# Altium PCB BatterySentinel-N2K-Orion-R5.PcbDoc
Units mil, origin at the board's own origin, x right, y up, seen from the top; angles counter-clockwise.
Board outline 2047.24 x 1417.32 mil, 2 copper layers (Top Layer, Bottom Layer), stack 62.992 mil thick; 37 components, 23 nets, 120 pads, 25 vias.
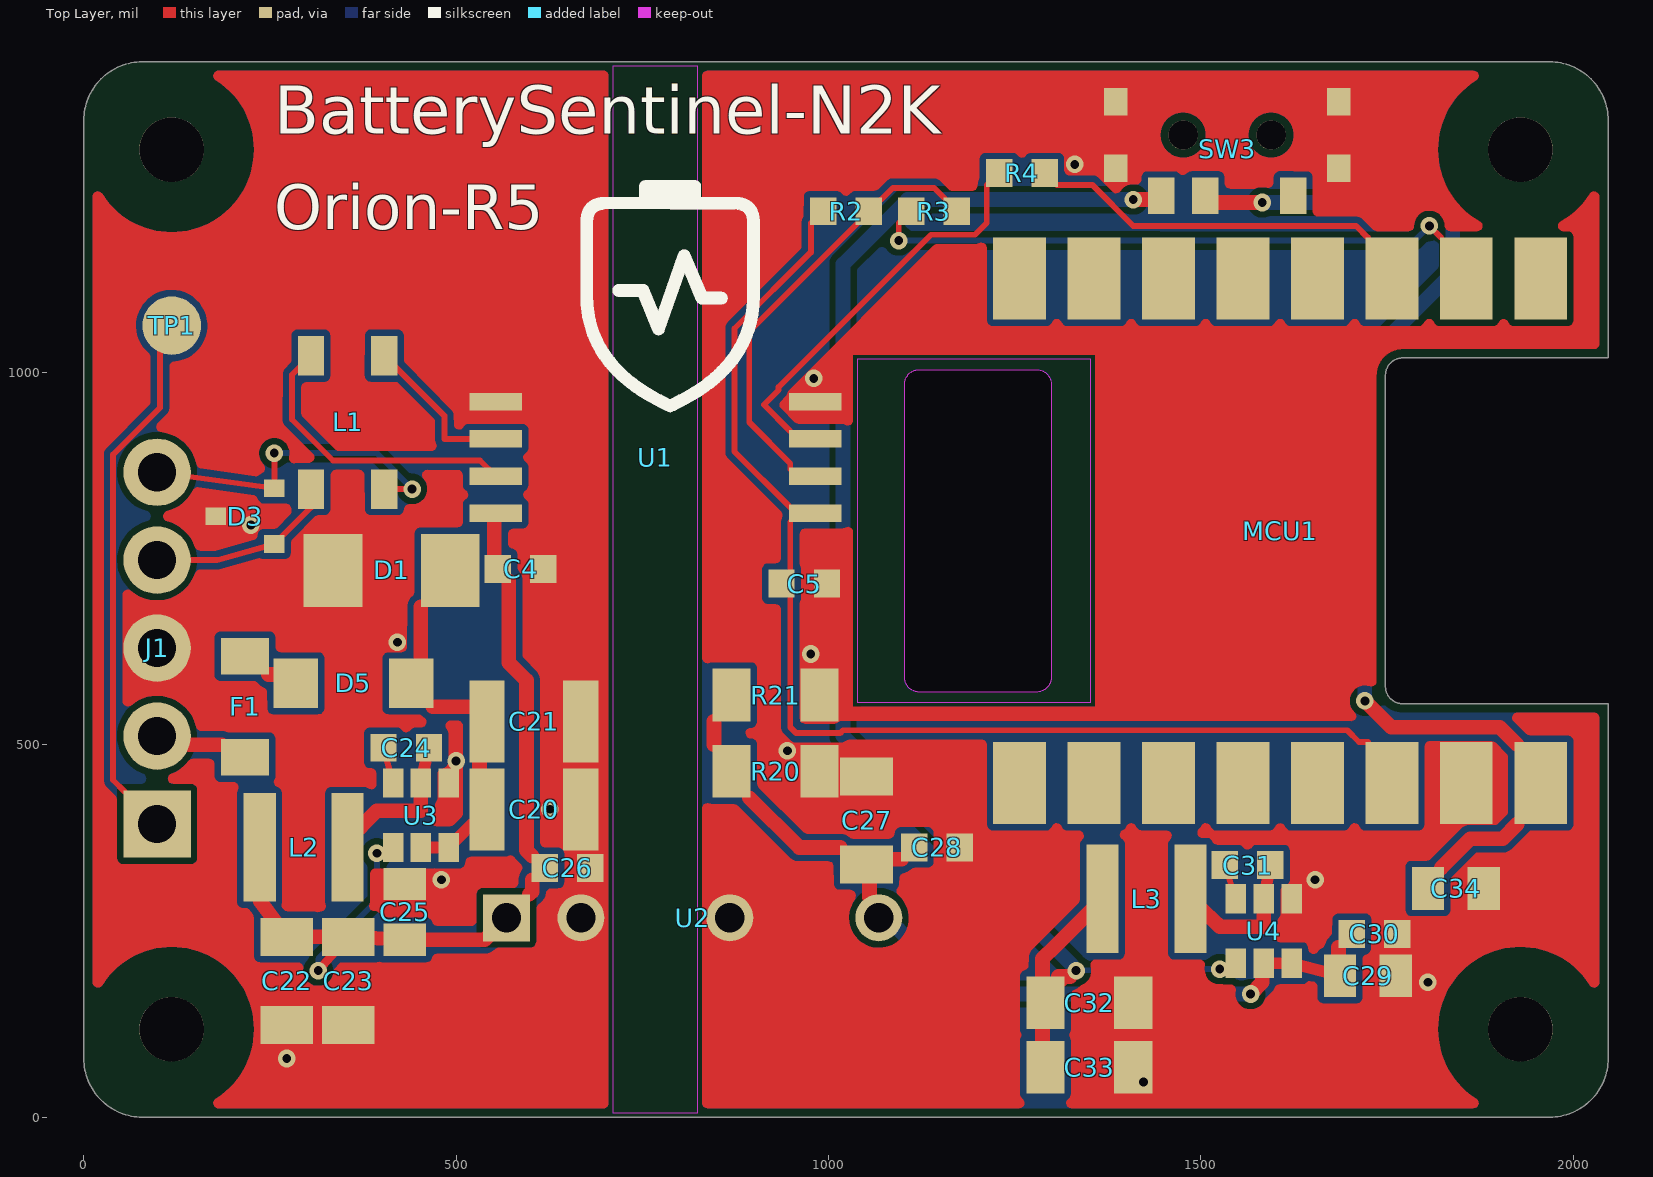
[diagram p0: Top Layer view]
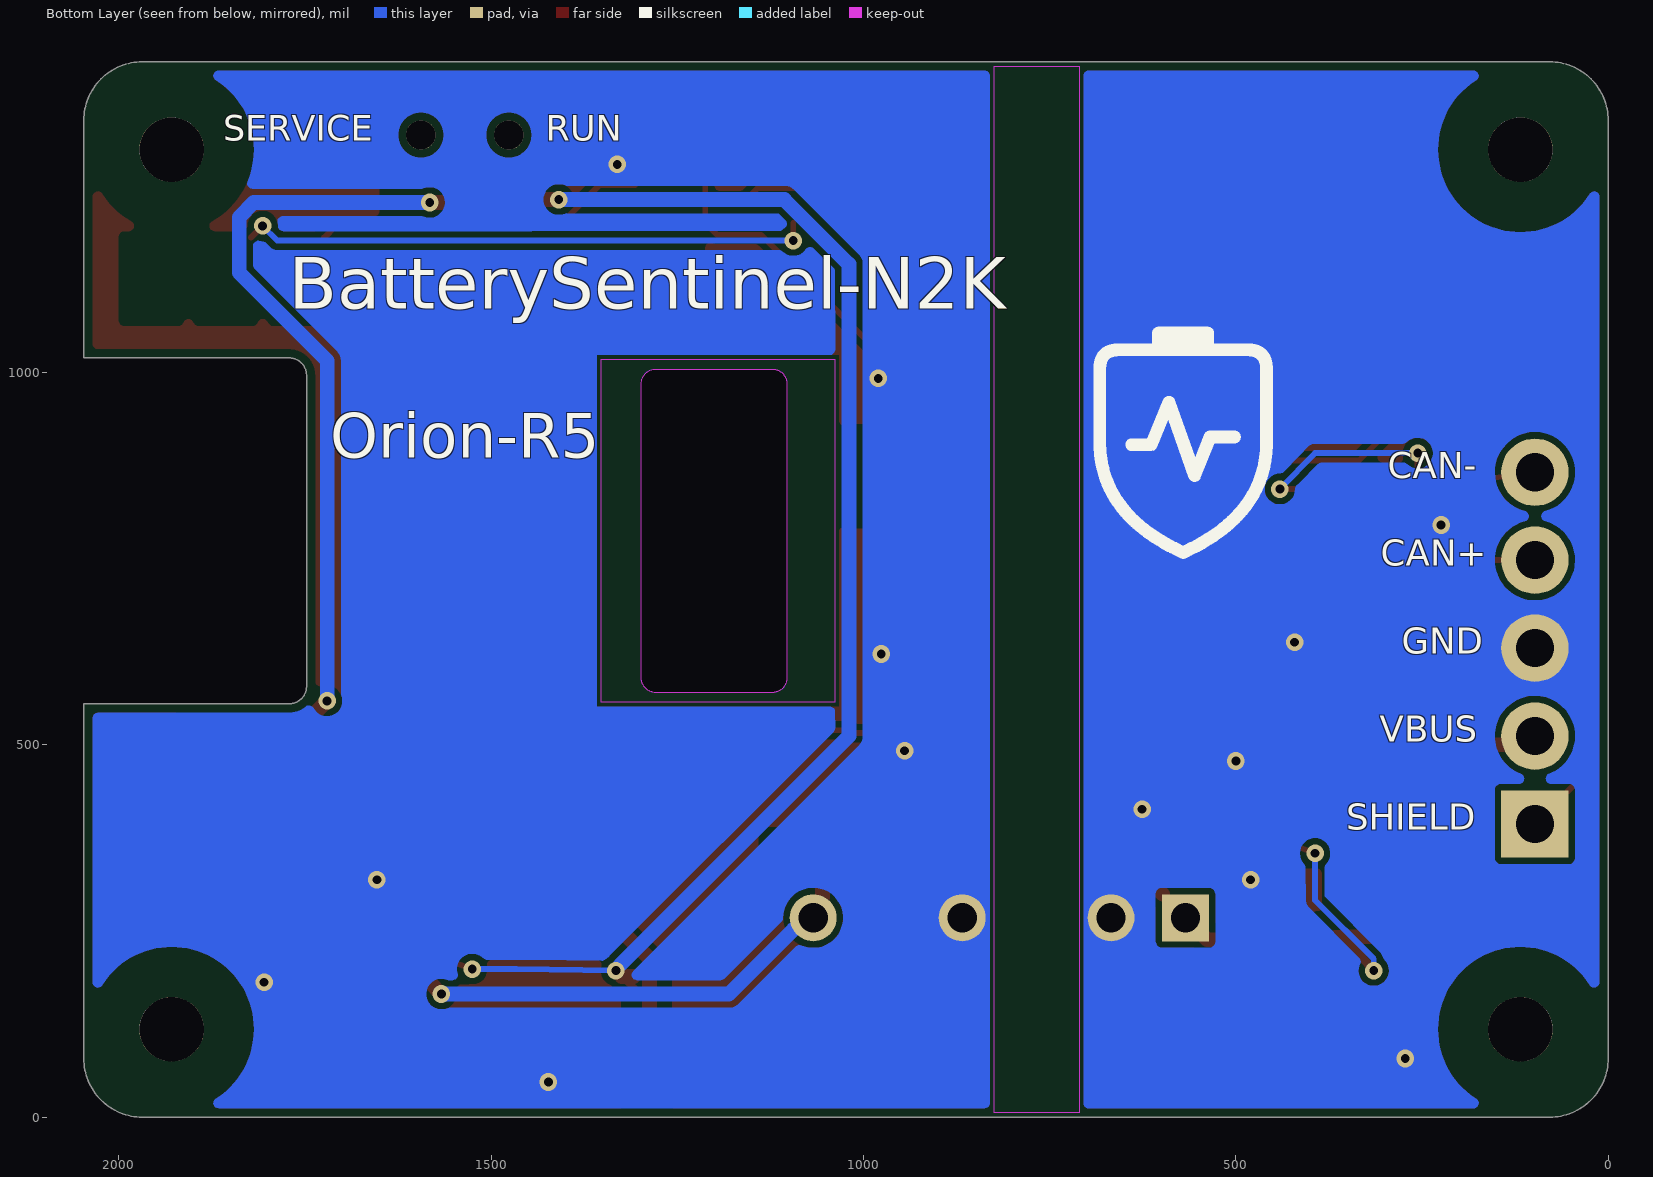
[diagram p1: Bottom Layer view, seen from below]

## Layer stack, top to bottom
Top Solder: solder mask 0.9843, SM-004, Dk 4
Top Layer: signal copper 1.378
Dielectric1: dielectric 60.2362, FR-4, Dk 4.3
Bottom Layer: signal copper 1.378
Bottom Solder: solder mask 0.9843, SM-004, Dk 4

## Board outline
78.74,0 74.88,0.09 71.02,0.38 67.19,0.85 63.38,1.51 59.61,2.36 55.88,3.39 52.21,4.6 48.61,5.99 45.07,7.56 41.62,9.3 38.26,11.2 34.99,13.27 31.83,15.5 28.79,17.87 25.86,20.4 23.06,23.06 20.4,25.86 17.87,28.79 15.5,31.83 13.27,34.99 11.2,38.26 9.3,41.62 7.56,45.07 5.99,48.61 4.6,52.21 3.39,55.88 2.36,59.61 1.51,63.38 0.85,67.19 0.38,71.02 0.09,74.88 0,78.74 0,1338.58 0.09,1342.45 0.38,1346.3 0.85,1350.14 1.51,1353.94 2.36,1357.71 3.39,1361.44 4.6,1365.11 5.99,1368.72 7.56,1372.25 9.3,1375.7 11.2,1379.06 13.27,1382.33 15.5,1385.49 17.87,1388.53 20.4,1391.46 23.06,1394.26 25.86,1396.93 28.79,1399.45 31.83,1401.83 34.99,1404.05 38.26,1406.12 41.62,1408.03 45.07,1409.76 48.61,1411.33 52.21,1412.72 55.88,1413.93 59.61,1414.96 63.38,1415.81 67.19,1416.47 71.02,1416.94 74.88,1417.23 78.74,1417.32 1968.5,1417.32 1972.37,1417.23 1976.22,1416.94 1980.06,1416.47 1983.87,1415.81 1987.64,1414.96 1991.36,1413.93 1995.03,1412.72 1998.64,1411.33 2002.17,1409.76 2005.62,1408.03 2008.98,1406.12 2012.25,1404.05 2015.41,1401.83 2018.46,1399.45 2021.38,1396.93 2024.18,1394.26 2026.85,1391.46 2029.37,1388.53 2031.75,1385.49 2033.97,1382.33 2036.04,1379.06 2037.95,1375.7 2039.68,1372.25 2041.25,1368.72 2042.64,1365.11 2043.85,1361.44 2044.88,1357.71 2045.73,1353.94 2046.39,1350.14 2046.86,1346.3 2047.15,1342.45 2047.24,1338.58 2047.24,1019.68 1771.65,1019.68 1770.49,1019.66 1769.34,1019.57 1768.19,1019.43 1767.05,1019.23 1765.91,1018.98 1764.8,1018.67 1763.7,1018.3 1762.61,1017.89 1761.55,1017.42 1760.52,1016.9 1759.51,1016.32 1758.53,1015.7 1757.58,1015.04 1756.67,1014.32 1755.79,1013.57 1754.95,1012.77 1754.15,1011.93 1753.39,1011.05 1752.68,1010.13 1752.01,1009.19 1751.39,1008.21 1750.82,1007.2 1750.3,1006.16 1749.83,1005.1 1749.41,1004.02 1749.05,1002.92 1748.74,1001.8 1748.49,1000.67 1748.29,999.53 1748.15,998.38 1748.06,997.22 1748.03,996.06 1748.03,578.74 1748.06,577.58 1748.15,576.42 1748.29,575.27 1748.49,574.13 1748.74,573 1749.05,571.88 1749.41,570.78 1749.83,569.7 1750.3,568.64 1750.82,567.6 1751.39,566.6 1752.01,565.62 1752.68,564.67 1753.39,563.75 1754.15,562.88 1754.95,562.04 1755.79,561.24 1756.67,560.48 1757.58,559.77 1758.53,559.1 1759.51,558.48 1760.52,557.91 1761.55,557.39 1762.61,556.92 1763.7,556.5 1764.8,556.14 1765.91,555.83 1767.05,555.57 1768.19,555.37 1769.34,555.23 1770.49,555.15 1771.65,555.12 2047.24,555.12 2047.24,78.74 2047.15,74.88 2046.86,71.02 2046.39,67.19 2045.73,63.38 2044.88,59.61 2043.85,55.88 2042.64,52.21 2041.25,48.61 2039.68,45.07 2037.95,41.62 2036.04,38.26 2033.97,34.99 2031.75,31.83 2029.37,28.79 2026.85,25.86 2024.18,23.06 2021.38,20.4 2018.46,17.87 2015.41,15.5 2012.25,13.27 2008.98,11.2 2005.62,9.3 2002.17,7.56 1998.64,5.99 1995.03,4.6 1991.36,3.39 1987.64,2.36 1983.87,1.51 1980.06,0.85 1976.22,0.38 1972.37,0.09 1968.5,0
cut-out: 1279.53,570.87 1122.05,570.87 1121.08,570.89 1120.12,570.96 1119.16,571.08 1118.21,571.24 1117.26,571.46 1116.33,571.71 1115.42,572.02 1114.51,572.36 1113.63,572.76 1112.77,573.19 1111.93,573.67 1111.11,574.18 1110.32,574.74 1109.56,575.33 1108.83,575.97 1108.13,576.63 1107.46,577.33 1106.83,578.06 1106.24,578.82 1105.68,579.61 1105.16,580.43 1104.69,581.27 1104.25,582.13 1103.86,583.02 1103.51,583.92 1103.21,584.84 1102.95,585.77 1102.74,586.71 1102.58,587.66 1102.46,588.62 1102.39,589.59 1102.36,590.55 1102.36,984.25 1102.39,985.22 1102.46,986.18 1102.58,987.14 1102.74,988.09 1102.95,989.03 1103.21,989.97 1103.51,990.88 1103.86,991.79 1104.25,992.67 1104.69,993.53 1105.16,994.37 1105.68,995.19 1106.24,995.98 1106.83,996.74 1107.46,997.47 1108.13,998.17 1108.83,998.84 1109.56,999.47 1110.32,1000.06 1111.11,1000.62 1111.93,1001.14 1112.77,1001.61 1113.63,1002.05 1114.51,1002.44 1115.42,1002.79 1116.33,1003.09 1117.26,1003.35 1118.21,1003.56 1119.16,1003.72 1120.12,1003.84 1121.08,1003.91 1122.05,1003.94 1279.53,1003.94 1280.49,1003.91 1281.46,1003.84 1282.42,1003.72 1283.37,1003.56 1284.31,1003.35 1285.24,1003.09 1286.16,1002.79 1287.06,1002.44 1287.94,1002.05 1288.81,1001.61 1289.65,1001.14 1290.46,1000.62 1291.25,1000.06 1292.02,999.47 1292.75,998.84 1293.45,998.17 1294.11,997.47 1294.74,996.74 1295.34,995.98 1295.9,995.19 1296.41,994.37 1296.89,993.53 1297.32,992.67 1297.71,991.79 1298.06,990.88 1298.37,989.97 1298.62,989.03 1298.83,988.09 1299,987.14 1299.12,986.18 1299.19,985.22 1299.21,984.25 1299.21,590.55 1299.19,589.59 1299.12,588.62 1299,587.66 1298.83,586.71 1298.62,585.77 1298.37,584.84 1298.06,583.92 1297.71,583.02 1297.32,582.13 1296.89,581.27 1296.41,580.43 1295.9,579.61 1295.34,578.82 1294.74,578.06 1294.11,577.33 1293.45,576.63 1292.75,575.97 1292.02,575.33 1291.25,574.74 1290.46,574.18 1289.65,573.67 1288.81,573.19 1287.94,572.76 1287.06,572.36 1286.16,572.02 1285.24,571.71 1284.31,571.46 1283.37,571.24 1282.42,571.08 1281.46,570.96 1280.49,570.89

## Design rules (kind name [scope] priority, off if disabled: settings)
BoardOutlineClearance BoardEdge_0_30mm [All] p1: gap=11.81 ignorepadtopadclearanceinfootprint=FALSE
Clearance Isolation_BUS_LOGIC [InNet('5V_BUS') Or InNet('BST_BUS') Or InNet('BUS_PROT') Or InNet('CANH') Or InNet('CANH_EXT') Or InNet('CANL') Or InNet('CANL_EXT') Or InNet('FUSED_IN') Or InNet('GND_BUS') Or InNet('NET_S') Or InNet('SHIELD') Or InNet('SW_BUS') vs InNet('3V3_LOGIC') Or InNet('5V_ISO') Or InNet('5V_MODULE') Or InNet('5V_REG') Or InNet('BST_LOGIC') Or InNet('GND_LOGIC') Or InNet('GPIO6') Or InNet('GPIO7') Or InNet('RXD') Or InNet('SW_LOGIC') Or InNet('TXD')] p1: gap=125.98 ignorepadtopadclearanceinfootprint=FALSE
Clearance Mounting_NPTH [IsPad And (HoleSize > 0) And (PadIsPlated = 'False') And (Not InComponent('SW3'))] p2: gap=66.93 ignorepadtopadclearanceinfootprint=FALSE
Clearance Switch_Locating_Holes [IsPad And (HoleSize > 0) And (PadIsPlated = 'False') And InComponent('SW3')] p3: gap=9.84 ignorepadtopadclearanceinfootprint=FALSE
Clearance [All] p4: gap=5.91 ignorepadtopadclearanceinfootprint=FALSE
ComponentClearance [All] p1: gap=9.84 collisioncheckmode=3 verticalgap=9.84 showdistances=FALSE
HoleSize [All] p1: absolutevalues=TRUE maxlimit=248.03 minlimit=11.81 maxpercent=80.000 minpercent=20.000
HoleToHoleClearance [All] p1: gap=9.84 allowstackedmicrovias=FALSE
MinimumAnnularRing PTH_AnnularRing [IsPad And (PadIsPlated = 'True')] p1: minimumring=7.09
MinimumAnnularRing Via_AnnularRing [IsVia] p2: minimumring=5.91
MinimumSolderMaskSliver [All] p1: minsoldermaskwidth=3.94
PasteMaskExpansion Paste_1to1 [All] p1: expansion=0
PolygonConnect [All] p1: connectstyle=Relief reliefconductorwidth=10 reliefentries=4 polygonreliefangle="90 Angle" airgapwidth=10
RoutingVias [All] p1: holewidth=11.81 width=23.62 viastyle="Through Hole" minholewidth=11.81 minwidth=23.62 maxholewidth=11.81 maxwidth=23.62
SilkToSilkClearance SilkToSilk [All] p1: silktosilkclearance=3.94
SilkToSolderMaskClearance R5_Legend_Clearance [IsPad] p1: minsilkscreentomaskgap=5.91 clearancetoexposedcopper=FALSE
SolderMaskExpansion TentedVias [IsVia] p1: expansion=-11.81 istentingtop=TRUE
SolderMaskExpansion PadSolderMask [All] p2: expansion=1.97 istentingtop=FALSE
Width [All] p1: maxlimit=78.74 minlimit=7.87 preferedwidth=11.81
23 further rules are at their usual default settings.

## Components (designator, comment, footprint, x,y, rotation, side; value= is the part's Value field where it differs from the comment)
C4 "100nF 50V X7R" C0603#1 586.61,736.22 r0 top
C5 "100nF 50V X7R" C0603#2 967.52,716.54 r0 top
C20 "10uF 50V X7R" C1210#1 604.33,413.39 r0 top
C21 "10uF 50V X7R" C1210#2 604.33,531.5 r0 top
C22 "22uF 25V X5R" C1206 272.64,183.07 r270 top
C23 "22uF 25V X5R" C1206 355.31,183.07 r270 top
C24 "100nF 50V X7R" C0603#2 433.07,496.06 r0 top
C25 "10uF 25V X5R" C0805 431.1,275.59 r90 top
C26 "100nF 50V X7R" C0603#3 649.61,334.65 r0 top
C27 "22uF 25V X5R" C1206 1051.18,398.62 r90 top
C28 "100nF 50V X7R" C0603#4 1145.67,362.2 r0 top
C29 "10uF 25V X5R" C0805 1724.41,189.96 r0 top
C30 "100nF 50V X7R" C0603#2 1733.27,246.06 r0 top
C31 "100nF 50V X7R" C0603#5 1562.99,338.58 r0 top
C32 "22uF 25V X5R" C1206 1350.39,153.54 r0 top
C33 "22uF 25V X5R" C1206 1350.39,66.93 r0 top
C34 "10uF 25V X5R" C0805 1842.52,307.09 r0 top
D1 "SMBJ18A 600W" SMB 413.39,734.25 r180 top
D3 "PESD2CAN24T-Q" SOT23_NEXPERIA_REFLOW 216.54,807.09 r90 top
D5 "SS26 2A 60V" SMA 362.2,582.68 r180 top
F1 "T0.8A 63VDC" BOURNS_SF1206S 216.54,551.18 r90 top
J1 "NMEA Micro-C pigtail" PIGTAIL_5_P3_D1P3 98.43,629.92 r180 top
L1 "ACT45B-510-2P-TL003" ACT45B 354.33,933.07 r90 top
L2 "4.7uH" SUNLORD_SWPA4030 295.28,362.2 r180 top
L3 "4.7uH" SUNLORD_SWPA4030 1427.17,293.31 r180 top
MCU1 "ESP32-C3 SuperMini" SUPERC3_B0FN4F6244_CAST16_SMD 1574.8,787.4 r270 top
R2 "10k 1% 0.1W" R0603 1023.62,1216.54 r0 top
R3 "33R" R0603 1141.73,1216.54 r0 top
R4 "33R" R0603 1259.84,1267.72 r0 top
R20 "150R 1% 0.5W" R1206 929.13,464.57 r0 top
R21 "150R 1% 0.5W" R1206 929.13,566.93 r0 top
SW3 "RUN / SERVICE" GSWITCH_MK12C02_G020 1535.43,1318.9 r0 top
TP1 "Shield / chassis pad" TESTPOINT_2MM 118.11,1062.99 r0 top
U1 "ISO1042DWV" SOIC8_DWV 767.72,885.83 r180 top
U2 "B0505S-3WR2" EVISUN_B0505S_3WR2 867.52,165.35 r0 top
U3 "AP63205WU-7" TSOT26_DIODES 452.76,405.51 r0 top
U4 "AP63205WU-7" TSOT26_DIODES 1584.65,250 r0 top

## Footprints (in the part's own frame and the unit in brackets; to place one, negate y for a bottom-side part, rotate by r counter-clockwise, add the part's x,y. Pads: shape width x height; smd on the part's side, far side on the other; paste and mask are expansions set on the pad)
ACT45B [mm] "TDK ACT45B recommended lands; windings 1-4 and 2-3"
  rect 1.35x0.9 smd: 1(-2.275,1.25) 2(-2.275,-1.25) 3(2.275,-1.25) 4(2.275,1.25)
  body extent -2.53,-1.6 2.52,1.6, height 2.8
BOURNS_SF1206S [mm] "Bourns SF-1206S recommended land pattern: total X span 4.7, inner gap 2.2, pad Y 1.65; maximum body envelope. No polarity."
  rect 1.25x1.65 smd: 1(-1.725,0)
  rect 1.25x1.65 smd mask+0.02: 2(1.725,0)
  body extent -1.6,-0.83 1.6,0.83, height 0.71
C0603#1 [mm] "IPC-style 0603 solder lands; selected MPN dimensions reviewed separately."
  rect 0.9x0.95 smd mask+0.015: 1(-0.775,0)
  rect 0.9x0.95 smd: 2(0.775,0)
  body extent -0.8,-0.41 0.8,0.41, height 0.81
C0603#2 [mm] "IPC-style 0603 solder lands; selected MPN dimensions reviewed separately."
  rect 0.9x0.95 smd: 1(-0.775,0) 2(0.775,0)
  body extent -0.8,-0.41 0.8,0.41, height 0.81
C0603#3 [mm] "IPC-style 0603 solder lands; selected MPN dimensions reviewed separately."
  rect 0.9x0.95 smd mask+0.01: 1(-0.775,0) 2(0.775,0)
  body extent -0.8,-0.41 0.8,0.41, height 0.81
C0603#4 [mm] "IPC-style 0603 solder lands; selected MPN dimensions reviewed separately."
  rect 0.9x0.95 smd: 1(-0.775,0)
  rect 0.9x0.95 smd mask+0.025: 2(0.775,0)
  body extent -0.8,-0.41 0.8,0.41, height 0.81
C0603#5 [mm] "IPC-style 0603 solder lands; selected MPN dimensions reviewed separately."
  rect 0.9x0.95 smd mask+0.015: 1(-0.775,0) 2(0.775,0)
  body extent -0.8,-0.41 0.8,0.41, height 0.81
C0805 [mm] "IPC-style 0805 solder lands; selected MPN dimensions reviewed separately."
  rect 1.1x1.45 smd: 1(-0.95,0) 2(0.95,0)
  body extent -1,-0.63 1,0.63, height 0.81
C1206 [mm] "IPC-style 1206 solder lands; selected MPN dimensions reviewed separately."
  rect 1.3x1.8 smd: 1(-1.5,0) 2(1.5,0)
  body extent -1.6,-0.81 1.6,0.81, height 1.52
C1210#1 [mm] "Samsung CL32B106KBJNNNE body3.2x2.5mm, nominal1210 land pattern selected."
  rect 1.2x2.8 smd: 1(-1.6,0)
  rect 1.2x2.8 smd mask+0.01: 2(1.6,0)
  body extent -1.6,-1.26 1.6,1.26, height 2.72
C1210#2 [mm] "Samsung CL32B106KBJNNNE body3.2x2.5mm, nominal1210 land pattern selected."
  rect 1.2x2.8 smd: 1(-1.6,0) 2(1.6,0)
  body extent -1.6,-1.26 1.6,1.26, height 2.72
EVISUN_B0505S_3WR2 [mm] "EVISUN p4: nominal19.65x7x10.16mm, unspecified body tolerance+/-0.25mm, lead1 x=2.21 from body left, pitch1-2=2.54/2-4=5.08/4-6=5.08mm. Pin row .90mm from long body edge. Bottom view mirrored vertically to PCB TOP: row Y=+2.60mm. Finished holes1.00mm, annulus.30mm. Primary/secondary pad copper gap3.48mm."
  rect 1.6x1.6 hole 1 paste-2539.97: 1(-7.615,2.6)
  round 1.6 hole 1 paste-2539.97: 2(-5.075,2.6) 4(0.005,2.6) 6(5.085,2.6)
  body extent -9.82,-3.5 9.82,3.5, height 10.33
GSWITCH_MK12C02_G020 [mm] "All shell tabs tied only to GND_LOGIC. No paste in NPTH. Keep travel envelope clear. Pin numbers1/2/3 assigned left/common/right as manufacturer circuit A/B; mounting pads4-7 are local library assignments."
  rect 0.9x1.25 smd: 1(-2.25,-2.075) 2(-0.75,-2.075) 3(2.25,-2.075)
  rect 0.8x0.93 smd: 4(-3.8,1.135) 5(-3.8,-1.135) 6(3.8,1.135) 7(3.8,-1.135)
  round 1 hole 1 unplated paste-2539.97 mask+0.05: ""(-1.5,0) ""(1.5,0)
  body extent -4.2,-2.7 4.2,3.35, height 1.4
PIGTAIL_5_P3_D1P3 [mm] "Designed carrier wire-solder interface, 3.0 pitch, 1.3 finished-hole target, 0.5 radial annulus. Pin numbering is logical NMEA: 1 shield, 2 NET-S, 3 NET-C, 4 CAN-H, 5 CAN-L. Cable and strain relief still require a physical selection."
  rect 2.3x2.3 hole 1.3 paste-2539.97: 1(0,6)
  round 2.3 hole 1.3 paste-2539.97: 2(0,3) 3(0,0) 4(0,-3) 5(0,-6)
  body extent -1.15,-7.15 1.15,7.15, height 0.06
R0603 [mm] "IPC-style 0603 solder lands; selected MPN dimensions reviewed separately."
  rect 0.9x0.95 smd: 1(-0.775,0) 2(0.775,0)
  body extent -0.8,-0.41 0.8,0.41, height 0.81
R1206 [mm] "IPC-style 1206 solder lands; selected MPN dimensions reviewed separately."
  rect 1.3x1.8 smd: 1(-1.5,0) 2(1.5,0)
  body extent -1.6,-0.81 1.6,0.81, height 1.52
SMA [mm] "MDD SS12-SS1200 Rev2025A3 p3 / SS22-SS2200 Rev2024A4 p3 suggested SMA pattern: pad1.52x1.68, centrepitch3.93, innergap2.41, totalX5.45mm. Maxbody4.5x2.8x2.45; pin1Kleft,2Aright. Visually checked selected C2480/C14238 PDFs."
  rect 1.52x1.68 smd: 1(-1.965,0)
  rect 1.52x1.68 smd mask+0.02: 2(1.965,0)
  body extent -2.54,-1.4 2.54,1.4, height 2.46
SMB [mm] "BORN SMBJ Series Rev2022-Jan-1-A p7 manufacturer pattern: pad2.0x2.5mm, innergap2.0mm, centres+/-2.0mm; maxbody4.7x3.9x2.5; pin1Kleft,2Aright. Visually checked selected C152104 PDF."
  rect 2x2.5 smd: 1(-2,0) 2(2,0)
  body extent -2.58,-1.95 2.57,1.95, height 2.51
SOIC8_DWV [mm] "TI DWV0008A manufacturer land pattern; pin 1 upper left"
  rect 1.8x0.6 smd mask+0.02: 1(-5.45,1.905) 2(-5.45,0.635) 3(-5.45,-0.635) 4(-5.45,-1.905)
  rect 1.8x0.6 smd: 5(5.45,-1.905) 6(5.45,-0.635) 7(5.45,0.635) 8(5.45,1.905)
  body extent -5.7,-2.93 5.7,2.93, height 2.82
SOT23_NEXPERIA_REFLOW [mm] "Nexperia SOT23 reflow footprint Fig10: 0.6 x 0.7 copper lands, 1.9 pin pitch and 2.0 row centres. Drawing is rotated 180 degrees to match existing top-view pin1 lower left, pin2 lower right, pin3 upper centre. Paste suggested0.5 x0.6, mask opening1.0 x1.0; set fabrication-specific expansions accordingly."
  rect 0.6x0.7 smd: 1(-0.95,-1) 2(0.95,-1) 3(0,1)
  body extent -1.5,-1.25 1.5,1.25, height 1.11
SUNLORD_SWPA4030 [mm] "Sunlord SWPA datasheet2025-05-08 p2 recommended SWPA4030S pattern: gap1.9, padwidth1.1, padheight3.7."
  rect 1.1x3.7 smd: 1(-1.5,0) 2(1.5,0)
  body extent -2,-2 2,2, height 3.02
SUPERC3_B0FN4F6244_CAST16_SMD [mm] "Selected ASIN B0FN4F6244. 16 SMD lands only, 2.8x1.8 at X +/-8.6; 2.54 pitch from Nologo reference. Outer castellation dimensions inferred from selected product photo, not a manufacturer land drawing. Manual perimeter soldering; no stencil paste, no carrier PTH, no pin headers. USB tails require the separate carrier cutout; see mechanical_interfaces."
  rect 2.8x1.8 smd paste-10: 0(8.6,-8.079) 1(8.6,-5.539) 2(8.6,-2.999) 3(8.6,-0.459) 3V3(8.6,4.621) 4(8.6,2.081) 5(-8.6,9.701) 5V(8.6,9.701) 6(-8.6,7.161) 7(-8.6,4.621) 8(-8.6,2.081) 9(-8.6,-0.459) 10(-8.6,-2.999) 20(-8.6,-5.539) 21(-8.6,-8.079) GND(8.6,7.161)
  body extent -9,-11.26 9,12.65, height 4.4
TESTPOINT_2MM [mm] "2 mm exposed top-copper test pad; no paste"
  round 2 smd paste-10: 1(0,0)
  body extent -1,-1 1,1, height 0.06
TSOT26_DIODES [mm] "Diodes DS41326 Rev3-2 p17 suggested TSOT26 copper: X=.70,Y=1.00,Y1=3.20 total span,C=.95. Top view: pin1 lower-left; pin4 upper-right."
  rect 0.7x1 smd: 1(-0.95,-1.1) 2(0,-1.1) 3(0.95,-1.1) 4(0.95,1.1) 5(0,1.1) 6(-0.95,1.1)
  body extent -1.5,-1.35 1.5,1.35, height 1.01

## Part data
C4: library part R5_C4_100nF, "100nF 16V X7R - generic specification; manufacturer/MPN not selected"
C5: library part R5_C5_100nF, "100nF 16V X7R - generic specification; manufacturer/MPN not selected"
C20: library part R5_C20_10uF
C21: library part R5_C21_10uF
C22: library part R5_C22_22uF
C23: library part R5_C23_22uF
C24: library part R5_C24_100nF
C25: library part R5_C25_10uF
C26: library part R5_C26_100nF
C27: library part R5_C27_22uF
C28: library part R5_C28_100nF
C29: library part R5_C29_10uF
C30: library part R5_C30_100nF
C31: library part R5_C31_100nF
C32: library part R5_C32_22uF
C33: library part R5_C33_22uF
C34: library part R5_C34_10uF, "10uF local module5V reservoir after RUN/SERVICE switch"
D1: library part R5_D1_SMBJ18A
D3: library part R5_D3_PESD2CAN24T_Q
D5: library part R5_D5_SS26
F1: library part R5_F1_T0.8A, "0.8 A slow-blow SMD ceramic fuse, 63 VDC, 50 A interrupt rating"
J1: library part R5_J1_NMEA, "Five direct wire-solder pads for a separately selected Micro-C cable; this is a PCB interface, not an invented connector MPN or face view"
L1: library part R5_L1_ACT45B_510_2P_TL003
L2: library part R5_L2_4.7uH
L3: library part R5_L3_4.7uH
MCU1: library part R5_MCU1_ESP32_C3, "User-selected C3 SuperMini; original onboard USB/BOOT/RESET; direct castellated solder mounting"
R2: library part R5_R2_10k, "10k - generic specification; manufacturer/MPN not selected"
R3: library part R5_R3_33R, "33R - generic specification; manufacturer/MPN not selected"
R4: library part R5_R4_33R, "33R - generic specification; manufacturer/MPN not selected"
R20: library part R5_R20_150R
R21: library part R5_R21_150R
SW3: library part R5_SW3_RUN, "Side-actuated SPDT service supply disconnect, 1A at6V, original SuperMini USB service"
TP1: library part R5_TP1_Shield, "Shield / chassis pad - generic specification; manufacturer/MPN not selected"
U1: library part R5_U1_ISO1042DWV
U2: library part R5_U2_B0505S_3WR2
U3: library part R5_U3_AP63205WU_7
U4: library part R5_U4_AP63205WU_7, "Isolated-side 5V buck / high-duty pass-through, feeding physical RUN/SERVICE disconnect"

## Free pads (board coordinates)
  round 86.61 hole 86.61 unplated paste-99999 mask+1.97: ""(118.11,118.11) ""(118.11,1299.21) ""(1929.13,118.11) ""(1929.13,1299.21)

## Via types
v1: diameter 23.62, hole 11.81, Top Layer to Bottom Layer, tented both sides, 25 vias

## Nets (pads, with @x,y where several pads share a name; then routed paths per layer and width w, separated by ;. In a path a pad name is that pad's centre, name@x,y a point inside that pad or via, vN(x,y) a via of type N, cw(c..) or ccw(c..) an arc to the next point about the centre after c; other vN are vias at no path point)
3V3_LOGIC: C5.1 MCU1.3V3 R2.1 U1.1 | length 1486.4
  Top Layer w7.87: C5.1@948.82,700.79 948.82,523.62 956.69,515.75 1015.75,515.75 1019.68,519.68 1696.85,519.68 1712.6,503.94 1724.41,503.94 ; C5.1@948.82,732.28 U1.1@948.82,799.21 ; U1.1@948.82,818.9 874.02,893.7 874.02,1059.06 976.38,1161.42 R2.1@976.38,1200.79
5V_BUS: C4.1 C22.1 C23.1 C25.1 C26.1 L2.2 U1.8 U2.1 U3.1 | length 1165
  Top Layer w7.87: v1(393.7,354.33) U3.1
  Top Layer w11.81: v1(314.96,196.85) C23.1
  Top Layer w19.68: L2.2 236.22,291.34 C22.1 C23.1 C25.1 538.19,238.19 U2.1 ; C4.1@551.18,751.97 U1.8@551.18,799.21 ; C4.1@570.87,720.47 570.87,610.24 594.49,586.61 594.49,358.27 C26.1@602.36,350.39 ; 598.43,299.21 602.36,303.15 C26.1@602.36,318.9
  Bottom Layer w7.87: v1(314.96,196.85) 314.96,212.6 393.7,291.34 v1(393.7,354.33)
5V_ISO: C27.1 C28.1 C29.1 C30.1 R20.1 R21.1 U2.6 U4.2 U4.3 | length 871.5
  Top Layer w15.75: U4.2 U4.3 C29.1
  Top Layer w19.68: 846.46,500 R21.1@846.46,531.5 ; R20.1@893.7,429.13 960.63,362.2 1015.75,362.2 ; U2.6@1055.12,295.28 C27.1@1055.12,314.96 ; C27.1@1082.68,346.46 C28.1@1098.43,346.46 ; v1(1566.93,165.35) 1582.68,181.1 U4.2@1582.68,188.98 ; C29.1@1685.04,216.54 C30.1@1685.04,228.35
  Bottom Layer w19.68: U2.6@1094.49,251.97 1181.1,165.35 v1(1566.93,165.35)
5V_MODULE: C34.1 MCU1.5V SW3.2 | length 1377.7
  Top Layer w19.68: SW3.2@1523.62,1228.35 v1(1582.68,1228.35) ; v1(1720.47,559.06) 1755.91,523.62 1901.57,523.62 MCU1.5V@1925.2,500 ; C34.1@1822.83,334.65 1862.2,374.02 1905.51,374.02 MCU1.5V@1925.2,393.7
  Bottom Layer w19.68: v1(1582.68,1228.35) 1818.9,1228.35 1838.58,1208.66 1838.58,1133.86 1720.47,1015.75 v1(1720.47,559.06)
5V_REG: C32.1 C33.1 L3.2 SW3.1 U4.1 | length 2078.8
  Top Layer w7.87: v1(1525.59,198.82) U4.1
  Top Layer w9.84: C32.1@1287.4,153.54 v1(1332.68,196.85)
  Top Layer w19.68: C33.1@1287.4,66.93 1287.4,153.54 1287.4,212.6 1305.12,230.31 L3.2 ; 1309.06,188.98 1324.8,188.98 v1(1332.68,196.85) ; v1(1409.45,1232.28) SW3.1@1429.13,1232.28
  Bottom Layer w7.87: v1(1332.68,196.85) 1466.54,198.82 v1(1525.59,198.82)
  Bottom Layer w19.68: v1@1326.77,204.72 1019.68,511.81 1019.68,1145.67 1106.3,1232.28 v1(1409.45,1232.28)
BST_BUS: C24.1 U3.6 | length 48.9
  Top Layer w7.87: C24.1 U3.6
BST_LOGIC: C31.1 U4.6 | length 47.6
  Top Layer w7.87: C31.1 U4.6
BUS_PROT: C20.1 C21.1 D1.1 D5.1 U3.2 U3.3 | length 239.7
  Top Layer w15.75: U3.2 U3.3 C20.1
  Top Layer w19.68: D5.1@452.76,614.17 D1.1@452.76,685.04 ; D5.1@468.5,551.18 C21.1@519.68,551.18 ; C20.1@531.5,468.5 C21.1@531.5,476.38
CANH: L1.4 U1.7 | length 401.4
  Top Layer w7.87: L1.4 279.53,997.05 279.53,937.01 334.65,881.89 532.09,881.89 U1.7
CANH_EXT: D3.1 J1.4 L1.1 | length 254.7
  Top Layer w7.87: J1.4 179.13,748.03 D3.1 305.12,818.9 L1.1
CANL: L1.3 U1.6 | length 214.1
  Top Layer w7.87: L1.3 484.25,941.93 484.25,910.83 U1.6
CANL_EXT: D3.2 J1.5 L1.2 | length 448.9
  Top Layer w7.87: J1.5 D3.2 v1(255.91,891.73) ; L1.2 v1(440.94,843.5)
  Bottom Layer w7.87: v1(255.91,891.73) 393.7,891.73 v1(440.94,843.5)
FUSED_IN: D5.2 F1.2 | length 7.9
  Top Layer w19.68: F1.2@248.03,594.49 D5.2@255.91,594.49
GND_BUS: C4.2 C20.2 C21.2 C22.2 C23.2 C25.2 C26.2 D1.2 D3.3 J1.3 U1.5 U2.2 U3.4 | length 1882.6
  Top Layer w15.75: v1(272.64,78.74) C22.2 ; U3.4 v1(500,478.35) ; v1(625.98,413.39) C20.2
  Top Layer w19.68: D3.3@188.98,795.28 v1(224.41,795.28) ; C22.2 C23.2 ; D1.2@374.02,685.04 v1(421.26,637.8) ; 389.76,149.61 437.01,196.85 586.61,196.85 U2.2@641.73,251.97 ; C25.2@456.69,318.9 v1(480.31,318.9) ; U1.5@586.61,952.76 610.24,929.13 C4.2@610.24,751.97 ; C4.2@633.86,720.47 633.86,598.43 645.67,586.61 ; C20.2@645.67,468.5 C21.2@645.67,476.38 ; U2.2@665.35,295.28 C26.2@665.35,318.9 ; C26.2@665.35,350.39 C20.2@665.35,358.27
  Bottom Layer w19.68: J1.3@118.11,669.29 118.11,677.17 224.41,783.46 ; v1(224.41,795.28) 251.97,795.28 v1@409.45,637.8 ; v1(421.26,637.8) 421.26,562.99 v1@496.06,488.19 ; v1(480.31,318.9) 555.12,393.7 555.12,421.26 ; v1(500,478.35) 555.12,431.1 608.27,431.1 v1(625.98,413.39)
GND_LOGIC: C5.2 C27.2 C28.2 C29.2 C30.2 C32.2 C33.2 C34.2 MCU1.GND R20.2 R21.2 SW3.4 SW3.5 SW3.6 SW3.7 U1.4 U2.4 U4.4 | length 3547.3
  Top Layer w15.75: C32.2@1405.51,153.54 1405.51,66.93 v1(1423.23,47.24) ; U4.4 v1(1653.54,318.9) ; C29.2 v1(1805.12,181.1)
  Top Layer w19.68: v1(944.88,492.13) R20.2@964.57,492.13 ; 976.38,602.36 v1(976.38,622.05) ; v1@980.32,629.92 C5.2@980.32,700.79 ; U1.4@980.32,972.44 v1(980.32,992.13) ; R20.2@1011.81,433.07 1015.75,433.07 ; C27.2@1082.68,433.07 1114.17,401.57 1141.73,401.57 C28.2@1165.35,377.95 ; v1(1330.71,1279.53) 1370.08,1279.53 ; 1370.08,1291.34 1370.08,1346.46 ; SW3.4@1401.57,1362.2 1614.17,1362.2 1637.8,1338.58 1637.8,1322.83 1669.29,1291.34 ; C32.2@1433.07,133.86 1708.66,133.86 1728.35,153.54 1728.35,157.48 C29.2@1755.91,185.04 ; 1641.73,1346.46 1669.29,1346.46 ; C29.2@1748.03,216.54 C30.2@1748.03,228.35 ; C30.2@1763.78,263.78 1763.78,342.52 1775.59,354.33 1783.46,354.33 MCU1.GND@1822.83,393.7 ; C30.2@1779.53,259.84 1838.58,259.84 1858.27,279.53
  Bottom Layer w19.68: U2.4@881.89,295.28 944.88,358.27 944.88,480.31 ; U2.4@897.64,259.84 1106.3,51.18 v1@1413.39,51.18 ; v1(944.88,492.13) 944.88,590.55 v1(976.38,622.05) ; v1@980.32,629.92 v1(980.32,992.13) ; v1@988.19,1000 988.19,1157.48 1094.49,1263.78 1314.96,1263.78 v1(1330.71,1279.53) ; v1(1653.54,318.9) 1791.34,181.1 v1(1805.12,181.1)
GPIO6: MCU1.6 R3.1 | length 766.6
  Top Layer w7.87: v1(1094.49,1177.17) R3.1@1094.49,1200.79 ; v1(1807.09,1196.85) 1822.83,1181.1
  Bottom Layer w7.87: v1(1094.49,1177.17) 1787.4,1177.17 v1(1807.09,1196.85)
GPIO7: MCU1.7 R4.2 | length 446.7
  Top Layer w7.87: R4.2@1307.09,1251.97 1354.33,1251.97 1409.45,1196.85 1708.66,1196.85 1724.41,1181.1
NET_S: F1.1 J1.2 | length 43.3
  Top Layer w19.68: J1.2@141.73,500 F1.1@185.04,500
RXD: R4.1 U1.3 | length 503.9
  Top Layer w7.87: U1.3@948.82,921.26 913.39,956.69 933.07,976.38 933.07,980.32 1137.8,1185.04 1196.85,1185.04 1212.6,1200.79 R4.1@1212.6,1251.97
SHIELD: J1.1 TP1.1 | length 623.2
  Top Layer w7.87: J1.1@55.12,437.01 39.37,452.76 39.37,889.76 102.36,952.76 TP1.1@102.36,1027.56
SW_BUS: C24.2 L2.1 U3.5 | length 200.6
  Top Layer w15.75: U3.5 C24.2
  Top Layer w19.68: L2.1@354.33,372.05 393.7,411.42 452.76,411.42 U3.5
SW_LOGIC: C31.2 L3.1 U4.5 | length 196.9
  Top Layer w15.75: U4.5 C31.2
  Top Layer w19.68: L3.1 1525.59,255.91 1584.65,255.91 U4.5
TXD: R2.2 R3.2 U1.2 | length 513.5
  Top Layer w7.87: U1.2@948.82,870.08 948.82,877.95 893.7,933.07 893.7,1055.12 R2.2@1039.37,1200.79 ; R2.2@1070.87,1232.28 1086.61,1248.03 1141.73,1248.03 R3.2@1157.48,1232.28
pads on no net: MCU1.0 MCU1.1 MCU1.2 MCU1.3 MCU1.4 MCU1.5 MCU1.8 MCU1.9 MCU1.10 MCU1.20 MCU1.21 SW3. SW3.3

## Keep-outs
Keep-Out Layer:
  region: 710.63,5.91 824.8,5.91 824.8,1411.42 710.63,1411.42
  region: 1038.98,557.09 1352.36,557.09 1352.36,1017.72 1038.98,1017.72

## Other copper
Top Layer:
  drawing of 20 lines, arcs and shapes, not listed
Bottom Layer:
  drawing of 37 lines, arcs and shapes, not listed

## Silkscreen, mask and mechanical layers (free items; w line width, h text height)
Top Overlay:
  drawing of 3 lines, arcs and shapes, not listed
  text "BatterySentinel-N2K" at 255.91,1299.21 h110.24
  text "Orion-R5" at 255.91,1173.23 h102.36
Bottom Overlay:
  drawing of 3 lines, arcs and shapes, not listed
  text "RUN" at 1427.17,1299.83 h59.06
  text "SERVICE" at 1860.2,1299.83 h59.06
  text "BatterySentinel-N2K" at 1771.65,1062.99 h118.11
  text "Orion-R5" at 1716.54,866.14 h102.36
  text "CAN-" at 296.35,846.92 h60
  text "CAN+" at 305.67,728.81 h60
  text "GND" at 277.18,610.7 h60
  text "VBUS" at 306.75,492.59 h60
  text "SHIELD" at 352.14,374.48 h60
Board outline:
  drawing of 332 lines, arcs and shapes, not listed
Isolation and RF planning:
  lines w3.94: 704.72,0 830.71,0 830.71,1417.32 704.72,1417.32 704.72,0 ; 1033.07,551.18 1358.27,551.18 1358.27,1023.62 1033.07,1023.62 1033.07,551.18